# Altium PCB MINI_Calculator_Final.PcbDoc
Units mil, origin at the board's own origin, x right, y up, seen from the top; angles counter-clockwise.
Board outline 6000 x 4000 mil, 2 copper layers (Top Layer, Bottom Layer); 45 components, 51 nets, 391 pads, 0 vias.
Unrouted connection lines stored in the file: 39.
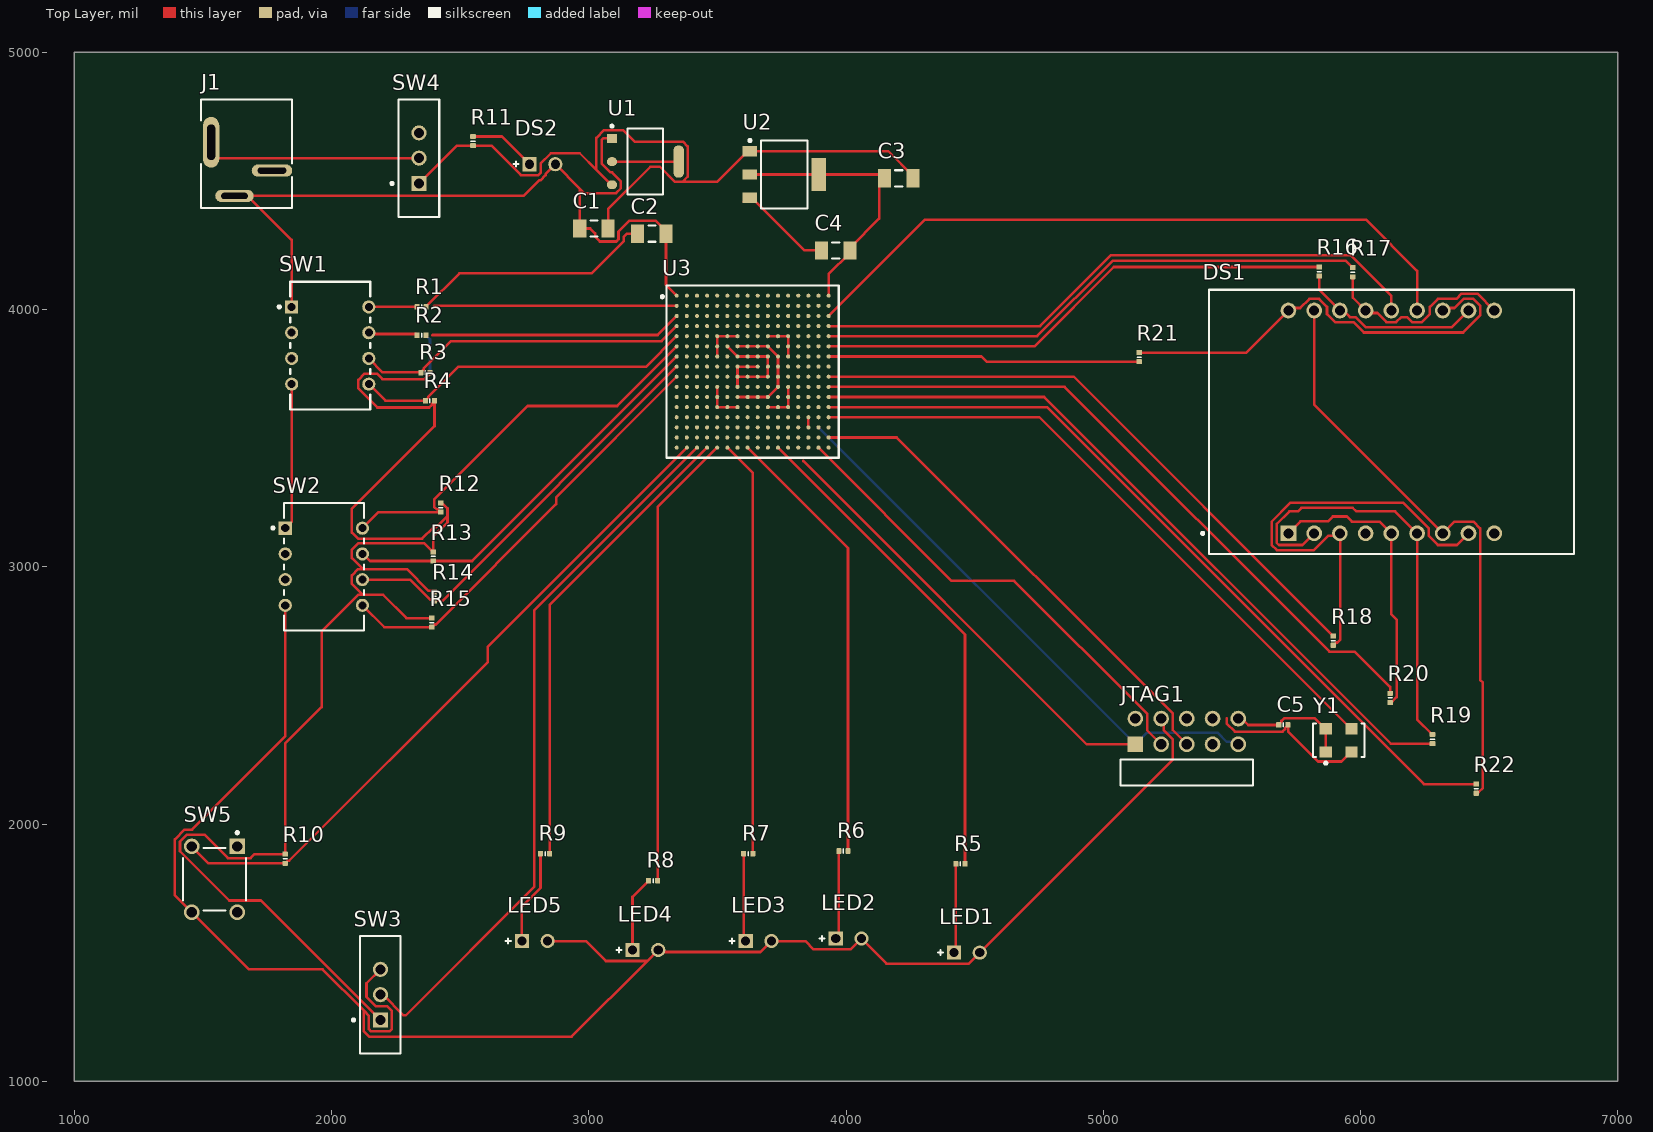
[diagram p0: Top Layer view]
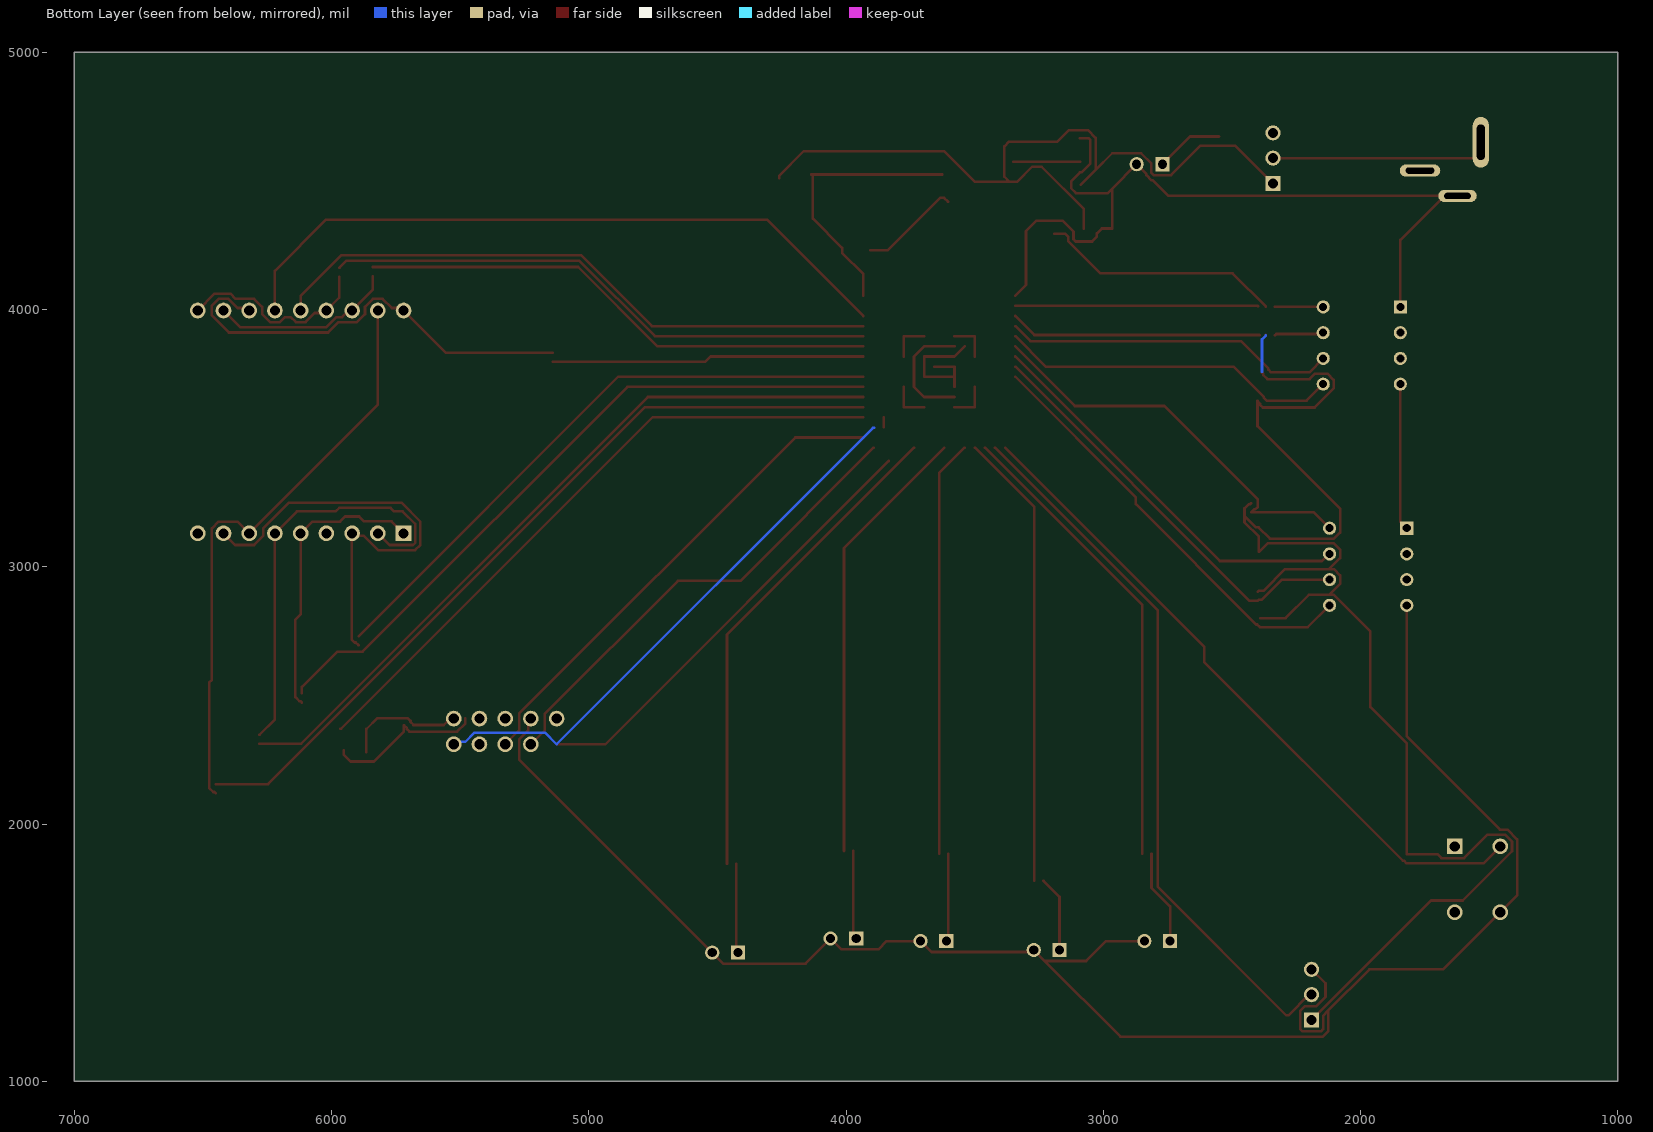
[diagram p1: Bottom Layer view, seen from below]
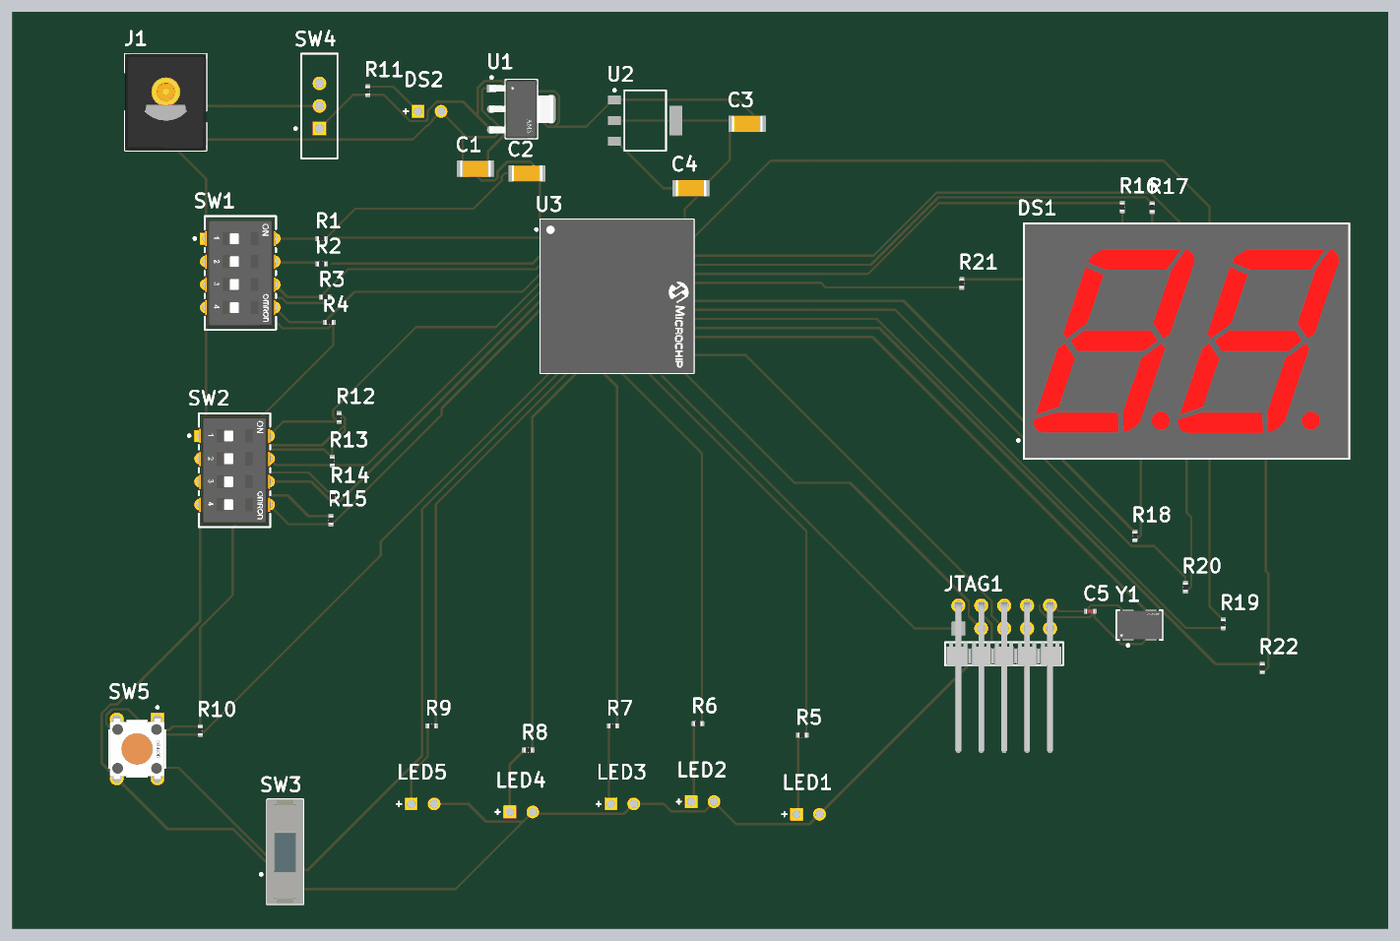
[diagram p2: 3D render of the assembled board from above, using the file's embedded part models]

## Layer stack, top to bottom
Top Solder: solder mask 0.4, Solder Resist, Dk 3.5
Top Layer: signal copper 1.4
Dielectric 1: dielectric 12.6, FR-4, Dk 4.8
Bottom Layer: signal copper 1.4
Bottom Solder: solder mask 0.4, Solder Resist, Dk 3.5

## Board outline
1000,1000 7000,1000 7000,5000 1000,5000

## Design rules (kind name [scope] priority, off if disabled: settings)
Clearance [All] p1: gap=10 ignorepadtopadclearanceinfootprint=FALSE
PolygonConnect [All] p1: connectstyle=Relief reliefconductorwidth=10 reliefentries=4 polygonreliefangle="90 Angle" airgapwidth=10
RoutingVias [All] p1: holewidth=28 width=50 viastyle="Through Hole" minholewidth=28 minwidth=50 maxholewidth=28 maxwidth=50
SolderMaskExpansion [All] p1: expansion=0 istentingtop=FALSE
SupplyNets "Schematic Supply Nets_3" [InNet('+5V')] p1: voltage=0.000
SupplyNets "Schematic Supply Nets_4" [InNet('VCC')] p2: voltage=0.000
SupplyNets "Schematic Supply Nets_2" [InNet('+1.5V')] p3: voltage=0.000
SupplyNets "Schematic Supply Nets_1" [InNet('GND')] p4: voltage=0.000
SupplyNets "Schematic Supply Nets" [InNet('+3.3V')] p5: voltage=0.000
Width [All] p1: maxlimit=10 minlimit=10 preferedwidth=10
30 further rules are at their usual default settings.

## Classes and differential pairs
component class User_IO: DS1 LED1 LED2 LED3 LED4 LED5 R1 R2 R3 R4 R5 R6 R7 R8 R9 R12 R13 R14 R15 R16 R17 R18 R19 R20 R21 R22 SW1 SW2 SW3
component class Power: C1 C2 C3 C4 DS2 J1 R11 SW4 U1 U2
component class JTAG_Clock: C5 JTAG1 R10 SW5 Y1
component class FPGA_Core: U3

## Components (designator, comment, footprint, x,y, rotation, side; value= is the part's Value field where it differs from the comment)
C1 "Capacitor 10 uF +/- 10% 16 V 1206" CAPC3216X180X50NL20T25 3020,4315 r0 top value=10µF
C2 "Capacitor 10 uF +/- 10% 16 V 1206" CAPC3216X180X50NL20T25 3245.12,4295 r0 top value=10µF
C3 "Capacitor 10 uF +/- 10% 16 V 1206" CAPC3216X180X50NL20T25 4204.88,4510 r0 top value=10µF
C4 "Capacitor 10 uF +/- 10% 16 V 1206" CAPC3216X180X50NL20T25 3960,4230 r0 top value=10µF
C5 "Capacitor 10nF +/-20% 50V 0402" CAPC0402(1005)60_L 5700,2385 r0 top value=10nF
DS1 "DC08-11SRWA" FP-DC08-11SRWA-MFG 6120,3563.07 r0 top
DS2 "LTL-1CHG" LTST-LTL-1CHG-2 2820,4565 r0 top
J1 "694106402002" 694106402002 1670,4605 r0 top
JTAG1 "MTSW-105-09-F-D-383-RA" SMTC-MTSW-105-09-X-D-383-RA 5125,2310 r0 top
LED1 "LTL-1CHG" LTST-LTL-1CHG-2 4470,1500 r0 top
LED2 "LTL-1CHG" LTST-LTL-1CHG-2 4010,1555 r0 top
LED3 "LTL-1CHG" LTST-LTL-1CHG-2 3660,1545 r0 top
LED4 "LTL-1CHG" LTST-LTL-1CHG-2 3220,1510 r0 top
LED5 "LTL-1CHG" LTST-LTL-1CHG-2 2790,1545 r0 top
R1 "Resistor 10K  +/-1 % 0402 63 mW" RESC0402(1005)_L 2350,4010 r0 top value=10k
R2 "Resistor 10K  +/-1 % 0402 63 mW" RESC0402(1005)_L 2350,3900 r0 top value=10k
R3 "Resistor 10K  +/-1 % 0402 63 mW" RESC0402(1005)_L 2365,3755 r0 top value=10k
R4 "Resistor 10K  +/-1 % 0402 63 mW" RESC0402(1005)_L 2382.72,3645 r0 top value=10k
R5 "330R2J" RESC0402(1005)_L 4445,1845 r0 top value=330
R6 "330R2J" RESC0402(1005)_L 3990,1895 r0 top value=330
R7 "330R2J" RESC0402(1005)_L 3620,1885 r0 top value=330
R8 "330R2J" RESC0402(1005)_L 3250,1780 r0 top value=330
R9 "330R2J" RESC0402(1005)_L 2830,1885 r0 top value=330
R10 "10KR2F" RESC0402(1005)_L 1820,1865 r90 top value=10k
R11 "Resistor 330R +/-5 % 0402 63 mW" RESC0402(1005)_L 2550,4655 r90 top value=330
R12 "Resistor 10K  +/-1 % 0402 63 mW" RESC0402(1005)_L 2425,3230 r90 top value=10k
R13 "Resistor 10K  +/-1 % 0402 63 mW" RESC0402(1005)_L 2395,3040 r90 top value=10k
R14 "Resistor 10K  +/-1 % 0402 63 mW" RESC0402(1005)_L 2400,2885 r90 top value=10k
R15 "Resistor 10K  +/-1 % 0402 63 mW" RESC0402(1005)_L 2390,2782.72 r90 top value=10k
R16 "330R2J" RESC0402(1005)_L 5840,4147.72 r90 top value=330
R17 "330R2J" RESC0402(1005)_L 5970,4145 r90 top value=330
R18 "330R2J" RESC0402(1005)_L 5895,2712.72 r90 top value=330
R19 "330R2J" RESC0402(1005)_L 6280,2330 r90 top value=330
R20 "330R2J" RESC0402(1005)_L 6115,2490 r90 top value=330
R21 "330R2J" RESC0402(1005)_L 5140,3815 r90 top value=330
R22 "330R2J" RESC0402(1005)_L 6450,2137.28 r90 top value=330
SW1 "A6TN-4104" FP-A6TN-4104-MFG 1995,3860 r270 top
SW2 "A6TN-4104" FP-A6TN-4104-MFG 1970,3000 r270 top
SW3 "EG1218" ESWI-EG1218_V 2190,1336.57 r90 top
SW4 "EG1218" ESWI-EG1218_V 2340,4588.43 r90 top
SW5 "B3F-1055" FP-B3F-1055-MFG 1545,1785 r270 top
U1 "AMS1117-3.3" FP-AMS1117-IPC_C 3220,4575 r0 top
U2 "LT1963AEST-1.5#TRPBF" LT-ST-3-SOT-223_N 3760,4525 r0 top
U3 "A3P600-FGG256I" FP-FG256-IPC_C 3637.2,3758.43 r0 top
Y1 "ASFLM1-50.000MHZ-C" FP-ASFLM-MFG 5915,2325 r0 top

## Footprints (in the part's own frame and the unit in brackets; to place one, negate y for a bottom-side part, rotate by r counter-clockwise, add the part's x,y. Pads: shape width x height; smd on the part's side, far side on the other; paste and mask are expansions set on the pad)
694106402002 [mm] "DC Power Jack Vertical THT ?6.4"
  oval 1.6x5 hole 0.8 slot 3.5 at 90 deg: 1(-3.5,1.15)
  oval 3.8x1.2 hole 0.6 slot 2.6 at 0 deg: 2(-1.2,-4.15)
  oval 4x1.2 hole 0.6 slot 2.8 at 0 deg: 3(2.5,-1.65)
  silkscreen extent -4.5,-5.35 4.5,5.35, body extent -4.5,-5.35 4.5,5.35, height 14.1
CAPC0402(1005)60_L [mm] "Chip Capacitor, Body 1.0x0.5mm, Height 0.6mm, IPC High Density"
  rrect25% 0.5x0.55 smd: 1(-0.45,0) 2(0.45,0)
  silkscreen extent 0,-0.2 0,0.2, body extent -0.5,-0.25 0.5,0.25, height 0.6
CAPC3216X180X50NL20T25 [mm] "Chip Capacitor, 2-Leads, Body 3.40x1.80mm, IPC Medium Density"
  rect 1.3x1.8 smd: 1(-1.4,0) 2(1.4,0)
  silkscreen extent -0.35,-0.8 0.35,0.8, body extent -1.7,-0.9 1.7,0.9, height 1.8
ESWI-EG1218_V [mm] "THD, 3-Leads, Body 11.6x4mm, Pitch 2.5mm"
  rect 1.5x1.5 hole 1: 1(-2.5,0)
  round 1.5 hole 1: 2(0,0) 3(2.5,0)
  silkscreen extent -5.8,-2 5.8,2.77, body extent -5.8,-2 5.8,2, height 7.4
FP-A6TN-4104-MFG [mm]
  rect 1.3x1.3 hole 0.8 paste-2539.97 mask+0: 1(-3.81,-3.81)
  round 1.3 hole 0.8 paste-2539.97 mask+0: 2(-1.27,-3.81) 3(1.27,-3.81) 4(3.81,-3.81) 5(3.81,3.81) 6(1.27,3.81) 7(-1.27,3.81) 8(-3.81,3.81)
  silkscreen extent -6.3,-5.16 6.3,3.95, body extent -6.4,-4.56 6.4,4.56, height 0.25
FP-AMS1117-IPC_C [mm]
  rect 1.004x0.872 smd paste+0 mask+0: 1(-3.295,2.29)
  rrect100% 1.004x0.872 smd paste+0 mask+0: 2(-3.295,0) 3(-3.295,-2.29)
  rrect87% 1.004x3.182 smd paste+0 mask+0: 4(3.295,0)
  silkscreen extent -3.42,-3.25 1.75,3.62, body extent -3.9,-3.35 3.9,3.35, height 0.25
FP-ASFLM-MFG [mm]
  rect 1.2x1.1 smd paste+0 mask+0: 1(-1.27,-1.15) 2(1.27,-1.15) 3(1.27,1.15) 4(-1.27,1.15)
  silkscreen extent -2.55,-2.37 2.55,1.65, body extent -2.65,-1.8 2.65,1.8, height 0.25
FP-B3F-1055-MFG [mm]
  rect 1.55x1.55 hole 1 paste-2539.97 mask+0: 1(-3.25,2.25)
  round 1.55 hole 1 paste-2539.97 mask+0: 2(3.25,2.25) 3(-3.25,-2.25) 4(3.25,-2.25)
  silkscreen extent -4.72,-3.1 3.1,3.1, body extent -4.13,-3.2 4.13,3.2, height 0.25
FP-DC08-11SRWA-MFG [mm]
  rect 1.55x1.55 hole 1 paste-2539.97 mask+0: 1(-10.16,-11)
  round 1.55 hole 1 paste-2539.97 mask+0: 2(-7.62,-11) 3(-5.08,-11) 4(-2.54,-11) 5(0,-11) 6(2.54,-11) 7(5.08,-11) 8(7.62,-11) 9(10.16,-11) 10(10.16,11) 11(7.62,11) 12(5.08,11) 13(2.54,11) 14(0,11) 15(-2.54,11) 16(-5.08,11) 17(-7.62,11) 18(-10.16,11)
  silkscreen extent -18.75,-13.05 18.03,13.05, body extent -18.13,-13.15 18.13,13.15, height 0.25
FP-FG256-IPC_C [mm]
  round 0.4 smd paste+0 mask+0: A1(-7.5,7.5) A2(-6.5,7.5) A3(-5.5,7.5) A4(-4.5,7.5) A5(-3.5,7.5) A6(-2.5,7.5) A7(-1.5,7.5) A8(-0.5,7.5) A9(0.5,7.5) A10(1.5,7.5) A11(2.5,7.5) A12(3.5,7.5) A13(4.5,7.5) A14(5.5,7.5) A15(6.5,7.5) A16(7.5,7.5) B1(-7.5,6.5) B2(-6.5,6.5) B3(-5.5,6.5) B4(-4.5,6.5) B5(-3.5,6.5) B6(-2.5,6.5) B7(-1.5,6.5) B8(-0.5,6.5) B9(0.5,6.5) B10(1.5,6.5) B11(2.5,6.5) B12(3.5,6.5) B13(4.5,6.5) B14(5.5,6.5) B15(6.5,6.5) B16(7.5,6.5) C1(-7.5,5.5) C2(-6.5,5.5) C3(-5.5,5.5) C4(-4.5,5.5) C5(-3.5,5.5) C6(-2.5,5.5) C7(-1.5,5.5) C8(-0.5,5.5) C9(0.5,5.5) C10(1.5,5.5) C11(2.5,5.5) C12(3.5,5.5) C13(4.5,5.5) C14(5.5,5.5) C15(6.5,5.5) C16(7.5,5.5) D1(-7.5,4.5) D2(-6.5,4.5) D3(-5.5,4.5) D4(-4.5,4.5) D5(-3.5,4.5) D6(-2.5,4.5) D7(-1.5,4.5) D8(-0.5,4.5) D9(0.5,4.5) D10(1.5,4.5) D11(2.5,4.5) D12(3.5,4.5) D13(4.5,4.5) D14(5.5,4.5) D15(6.5,4.5) D16(7.5,4.5) E1(-7.5,3.5) E2(-6.5,3.5) E3(-5.5,3.5) E4(-4.5,3.5) E5(-3.5,3.5) E6(-2.5,3.5) E7(-1.5,3.5) E8(-0.5,3.5) E9(0.5,3.5) E10(1.5,3.5) E11(2.5,3.5) E12(3.5,3.5) E13(4.5,3.5) E14(5.5,3.5) E15(6.5,3.5) E16(7.5,3.5) F1(-7.5,2.5) F2(-6.5,2.5) F3(-5.5,2.5) F4(-4.5,2.5) F5(-3.5,2.5) F6(-2.5,2.5) F7(-1.5,2.5) F8(-0.5,2.5) F9(0.5,2.5) F10(1.5,2.5) F11(2.5,2.5) F12(3.5,2.5) F13(4.5,2.5) F14(5.5,2.5) F15(6.5,2.5) F16(7.5,2.5) G1(-7.5,1.5) G2(-6.5,1.5) G3(-5.5,1.5) G4(-4.5,1.5) G5(-3.5,1.5) G6(-2.5,1.5) G7(-1.5,1.5) G8(-0.5,1.5) G9(0.5,1.5) G10(1.5,1.5) G11(2.5,1.5) G12(3.5,1.5) G13(4.5,1.5) G14(5.5,1.5) G15(6.5,1.5) G16(7.5,1.5) H1(-7.5,0.5) H2(-6.5,0.5) H3(-5.5,0.5) H4(-4.5,0.5) H5(-3.5,0.5) H6(-2.5,0.5) H7(-1.5,0.5) H8(-0.5,0.5) H9(0.5,0.5) H10(1.5,0.5) H11(2.5,0.5) H12(3.5,0.5) H13(4.5,0.5) H14(5.5,0.5) H15(6.5,0.5) H16(7.5,0.5) J1(-7.5,-0.5) J2(-6.5,-0.5) J3(-5.5,-0.5) J4(-4.5,-0.5) J5(-3.5,-0.5) J6(-2.5,-0.5) J7(-1.5,-0.5) J8(-0.5,-0.5) J9(0.5,-0.5) J10(1.5,-0.5) J11(2.5,-0.5) J12(3.5,-0.5) J13(4.5,-0.5) J14(5.5,-0.5) J15(6.5,-0.5) J16(7.5,-0.5) K1(-7.5,-1.5) K2(-6.5,-1.5) K3(-5.5,-1.5) K4(-4.5,-1.5) K5(-3.5,-1.5) K6(-2.5,-1.5) K7(-1.5,-1.5) K8(-0.5,-1.5) K9(0.5,-1.5) K10(1.5,-1.5) K11(2.5,-1.5) K12(3.5,-1.5) K13(4.5,-1.5) K14(5.5,-1.5) K15(6.5,-1.5) K16(7.5,-1.5) L1(-7.5,-2.5) L2(-6.5,-2.5) L3(-5.5,-2.5) L4(-4.5,-2.5) L5(-3.5,-2.5) L6(-2.5,-2.5) L7(-1.5,-2.5) L8(-0.5,-2.5) L9(0.5,-2.5) L10(1.5,-2.5) L11(2.5,-2.5) L12(3.5,-2.5) L13(4.5,-2.5) L14(5.5,-2.5) L15(6.5,-2.5) L16(7.5,-2.5) M1(-7.5,-3.5) M2(-6.5,-3.5) M3(-5.5,-3.5) M4(-4.5,-3.5) M5(-3.5,-3.5) M6(-2.5,-3.5) M7(-1.5,-3.5) M8(-0.5,-3.5) M9(0.5,-3.5) M10(1.5,-3.5) M11(2.5,-3.5) M12(3.5,-3.5) M13(4.5,-3.5) M14(5.5,-3.5) M15(6.5,-3.5) M16(7.5,-3.5) N1(-7.5,-4.5) N2(-6.5,-4.5) N3(-5.5,-4.5) N4(-4.5,-4.5) N5(-3.5,-4.5) N6(-2.5,-4.5) N7(-1.5,-4.5) N8(-0.5,-4.5) N9(0.5,-4.5) N10(1.5,-4.5) N11(2.5,-4.5) N12(3.5,-4.5) N13(4.5,-4.5) N14(5.5,-4.5) N15(6.5,-4.5) N16(7.5,-4.5) P1(-7.5,-5.5) P2(-6.5,-5.5) P3(-5.5,-5.5) P4(-4.5,-5.5) P5(-3.5,-5.5) P6(-2.5,-5.5) P7(-1.5,-5.5) P8(-0.5,-5.5) P9(0.5,-5.5) P10(1.5,-5.5) P11(2.5,-5.5) P12(3.5,-5.5) P13(4.5,-5.5) P14(5.5,-5.5) P15(6.5,-5.5) P16(7.5,-5.5) R1(-7.5,-6.5) R2(-6.5,-6.5) R3(-5.5,-6.5) R4(-4.5,-6.5) R5(-3.5,-6.5) R6(-2.5,-6.5) R7(-1.5,-6.5) R8(-0.5,-6.5) R9(0.5,-6.5) R10(1.5,-6.5) R11(2.5,-6.5) R12(3.5,-6.5) R13(4.5,-6.5) R14(5.5,-6.5) R15(6.5,-6.5) R16(7.5,-6.5) T1(-7.5,-7.5) T2(-6.5,-7.5) T3(-5.5,-7.5) T4(-4.5,-7.5) T5(-3.5,-7.5) T6(-2.5,-7.5) T7(-1.5,-7.5) T8(-0.5,-7.5) T9(0.5,-7.5) T10(1.5,-7.5) T11(2.5,-7.5) T12(3.5,-7.5) T13(4.5,-7.5) T14(5.5,-7.5) T15(6.5,-7.5) T16(7.5,-7.5)
  silkscreen extent -9.05,-8.5 8.5,8.5, body extent -8.6,-8.6 8.6,8.6, height 0.25
LT-ST-3-SOT-223_N [mm] "SOT223, 4-Leads, Body 6.505x3.505mm, Pitch 2.3mm, IPC Medium Density"
  rect 1.4x1 smd: 1(-3.4,2.3) 2(-3.4,0) 3(-3.4,-2.3)
  rect 1.4x3.25 smd: 4(3.4,0)
  silkscreen extent -3.52,-3.35 2.3,3.47, body extent -1.86,-3.35 1.86,3.35, height 1.8
LTST-LTL-1CHG-2 [mm] "TH, 2-Leads, Dia 3.8mm"
  rect 1.4x1.4 hole 0.9: 1(-1.27,0)
  round 1.4 hole 0.9: 2(1.27,0)
  silkscreen extent -2.87,-0.25 -2.37,0.25, body extent -1.9,-1.9 1.9,1.9, height 6.5
RESC0402(1005)_L [mm] "Chip Resistor, Body 1.0x0.5mm, IPC High Density"
  rrect25% 0.5x0.55 smd: 1(-0.45,0) 2(0.45,0)
  silkscreen extent 0,-0.2 0,0.2, body extent -0.5,-0.25 0.5,0.25, height 0.3
SMTC-MTSW-105-09-X-D-383-RA [mm] "Assembly .025\" [.64] SQ Post Terminal Strip, 2x5 Pins, Right Angle, 2.54mm Pitch, Male"
  rect 1.55x1.55 smd: 1(0,0)
  round 1.55 hole 1.02: 2(0,2.54) 3(2.54,0) 4(2.54,2.54) 5(5.08,0) 6(5.08,2.54) 7(7.62,0) 8(7.62,2.54) 9(10.16,0) 10(10.16,2.54)
  silkscreen extent -1.46,-4.06 11.62,-1.52, body extent -1.27,-13.79 11.43,2.86, height 5.59

## Part data
C1 C2 C3 C4: library part CMP-001-00016-6, "Chip Capacitor, 10 uF, +/- 10%, 16 V, 1206 (3216 Metric)", Capacitor Type=Ceramic, Case/Package=1206, Max Operating Temperature=125°C, Min Operating Temperature=-55°C, Tolerance=10%, Voltage Rating=16V, Mounting Technology=SM, Pins=2, RoHS Compliant=True
C5: library part CMP-001-00069-3, "Chip Capacitor, 10nF +/-20%, 50V, 0402, Thickness 0.6 mm", Case/Package=0402, Max Operating Temperature=85°C, Min Operating Temperature=-55°C, Tolerance=5%, Voltage Rating=50V, Mounting Technology=SMT, Pins=2
DS1: library part CMP-00030-00004-1, "7 Seg Numeric LED Display, 2-Character, Super Bright Red, 20.32mm", Case/Package=DIP, Max Operating Temperature=85°C, Min Operating Temperature=-40°C
DS2 LED1 LED2 LED3 LED4 LED5: library part CMP-007-00019-2, "LED Uni-Color Green, 100 mW, 30 mA, -55 to 100 degC, 2-Pin THD, RoHS, Bulk", Case/Package=Radial, Colour=Green, Forward Current=30mA, Forward Voltage=2.6V, Manufacturer=Lite-On, Max Operating Temperature=100°C, Min Operating Temperature=-55°C, Package Description="2-Pin Through Hole Device, Dia 3.8 mm", Package Quantity=1000, Power=100mW, Datasheet URL=http://datasheet.octopart.com/LTL-1CHG-Lite-On-datasheet-143841.pdf, Datasheet Version=Mar-00, Illumination Colour=Green, Lens Style=Dome, Luminous Intensity=12.6mcd, Manufacturer URL=http://www.us.liteon.com/, Mounting Technology=TH, Nominal Vf=2.1V, Package Reference=LTL-1CHG, Packaging=Bulk, Pins=2, RoHS Compliant=True, Viewing Angle=60degrees
J1: library part CMP-1502-00189-3, "DC Power Jack Connector WR-DC, Male, Vertical, THT, 3 A, 20 V", Color=Black, Current Rating=3A, Flammability Rating="UL94 V-0", Insulation Resistance=100MΩ, Max Operating Temperature=85°C, Min Operating Temperature=-40°C, Operating Supply Voltage=20V, Voltage Rating=30V, Connector Type=Power, Contact Gender=Female, Contact Material=Gold, Contact Plating=Tin, Gender=Male, Height=14.3mm, Housing Material=Polyamide, Mount="Through Hole", Number of Contacts=1, Orientation=Vertical, Packaging=Bulk, REACH SVHC=Unknown, RoHS=Compliant, Shielding=Unshielded, Termination="Through Hole", Voltage Rating (DC)=20V
JTAG1: library part CMP-002-00071-1, "Pin Header, Board-to-Board, 2 Rows, 10 Contacts, Through Hole, MTSW Series, Unshrouded, Horizontal", Max Operating Temperature=125°C, Min Operating Temperature=-55°C, Pins=10
R1 R2 R3 R4 R12 R13 R14 R15: library part CMP-009-00149-3, "Chip Resistor, 10 kOhms, +/-1 %, 63 mW, -55 to 125 degC, 0402", Case/Package=0402, Max Operating Temperature=155°C, Min Operating Temperature=-55°C, Power=63mW, Tolerance=1%, Pins=2
R5 R6 R7 R8 R9 R16 R17 R18 R19 R20 R21 R22: library part CMP-009-00095-2, "330R 0.063W 5% 0402 (1005 Metric)  SMD", Case/Package=0402, Power=63mW, Tolerance=5%, Mounting Technology=SMT, Pins=2
R10: library part CMP-009-00066-2, "10K 0.063W 1% 0402 (1005 Metric)  SMD", Case/Package=0402, Power=63mW, Tolerance=1%, Mounting Technology=SMT, Pins=2
R11: library part CMP-009-00132-3, "Chip Resistor, 330 Ohms, +/-5 %, 63 mW, -55 to 155 degC, 0402", Case/Package=0402, Max Operating Temperature=155°C, Min Operating Temperature=-55°C, Power=63mW, Tolerance=5%, Pins=2
SW1 SW2: library part CMP-08827-000057-1, "SWITCH SLIDE DIP SPST 25MA 24V", Contact Resistance=200mR, Current Rating=25mA, Max Operating Temperature=85°C, Max Voltage Rating (DC)=24V, Min Operating Temperature=-30°C, Package Quantity=35, Actuator Length=1mm, Actuator Type="Slide (Standard)", Electrical Life=1000Cycles, Length=0.476inch, Max Current Rating=25mA, Mount="Through Hole", Number of Circuits=4, Number of Positions=4, Orientation=Straight, Packaging=Rail/Tube, Pitch=0.1inch, RoHS Compliant=Yes, Series=A6TN, Terminal Pitch=2.54mm, Termination="PC Pins", Throw Configuration=SPST, Voltage Rating (DC)=24V, Washable=Yes, Weight=0.58g
SW3: library part CMP-011-00006-2, "Slide Switch, SPDT, 500 V, -20 to 70 degC, 3-Pin THD, RoHS, Bulk", Contact Current Rating=200mA, Manufacturer=E-Switch, Max Operating Temperature=70°C, Min Operating Temperature=-20°C, Operating Force=250gf, Package Description="3-Pin Through Hole Device, Body 11.6 x 4 mm, Pitch 2.5 mm", Package Quantity=1000, Voltage Rating (AC)=30V, Case/Package=EG1218, Contact Finish=Silver, Contact Material=Copper, Contact Plating=Silver, Current Rating=200mA, Datasheet URL=https://www.e-switch.com/system/asset/product_line/data_sheet/119/EG.pdf, Datasheet Version=Oct-15, Manufacturer URL=http://www.e-switch.ch/en/, Mounting Technology=TH, Package Reference=EG1218, Packaging=Bulk, Pins=3, RoHS Compliant=True, Throw Configuration=SPDT, Voltage Rating (DC)=30V
SW4: library part CMP-1696-00002-1, "Slide Switch, 500 V, -20 to 70 degC, 3-Pin THD, RoHS", Case\Package=SOT-23-5, Dropout Voltage="300 mV", Max Input Voltage="8 V", Max Operating Temperature="85 degC", Max Ouput Current="150 mA", Max Power Dissipation="250 mW", Min Input Voltage="4.3 V", Min Operating Temperature="-40 degC", Nominal Output Voltage="3.3 V", Package Quantity=3000, ComponentLink1Description="Manufacturer URL", ComponentLink1URL=http://www.e-switch.ch/en/, ComponentLink2Description=Datasheet, ComponentLink2URL=https://www.e-switch.com/system/asset/product_line/data_sheet/119/EG.pdf, DatasheetVersion=Oct-15, Height="1.3 mm", Length="3 mm", Mount="Surface Mount", Output Current="150 mA", Output Voltage="3.3 V", Outputs=1, PackageDescription="3-Pin Through Hole Device, Body 11.6 x 4 mm, Pitch 2.5 mm", PackageReference=EG1218, Packaging="Tape and Reel", Pins=5, Power Rating="250 mW", Radiation Hardening=No, REACH SVHC="No SVHC", RoHSCompliant=true, Width="1.8 mm"
SW5: library part CMP-08834-000061-1, "SWITCH TACTILE SPST-NO 0.05A 24V", Actuator Color=Orange, Contact Current Rating=50mA, Contact Resistance=100mR, Max Operating Temperature=70°C, Max Voltage Rating (DC)=24V, Min Operating Temperature=-25°C, Operating Force=2.55N, Package Quantity=1500, Actuator Length=3mm, Contact Material=Gold, Contact Plating=Silver, Contact Type="1 maker", Current Rating=50mA, Depth=6mm, Electrical Life=300000Cycles, Height=7.3mm, Illumination Type=Non-Illuminated, Lead Free="Lead Free", Length=6mm, Max Current Rating=50mA, Mechanical Life=100000Cycles, Mount="Through Hole", Number of Poles=1, Orientation=Straight, Packaging=Bag, RoHS Compliant=Yes, Series=B3F, Switch Function=Off-Mom, Switch Travel=0.25mm, Termination="PC Pins", Throw Configuration=SPST, Voltage Rating (DC)=24V, Weight=0.25g, Width=6mm
U1: library part CMP-209535-000001-1, "LDO Voltage Regulators 1A, 3.3V", Dropout Voltage=1.1V, Manufacturer="Advanced Monolithic Systems", Max Junction Temp=+125°C, Max Power Dissipation=1.2W, Max Supply Voltage=15V, Nominal Supply Current=5mA, Output Current=1A, Output Voltage=3.3V, Package=AMS1117, Temperature="-40°C to +125°C", Temperature Range Low=-40°C, Automotive=No, Category=IC, ComponentLink2Description=Datasheet, ComponentLink2URL=http://www.advanced-monolithic.com/pdf/ds1117.pdf, Device Class L1="Integrated Circuits (ICs)", Device Class L2="Power Management ICs", Device Class L3="Voltage Regulators - Linear", Height=1.8mm, Ipc Land Pattern Name=SOT229P700X180-4, Lead Free=Yes, Manufacturer Part Number=AMS1117-3.3, Number Of Outputs=1, Octopart=https://octopart.com/ams1117-3.3-advanced+monolithic+systems-25899300, Output Type=Fixed, RoHS=TRUE, Standoff Height=0.64mm, Temperature Range High=+125°C
U2: library part CMP-0476-01777-1, "1.5 A, Low Noise, Fast Transient Response LDO Regulator, 2.1 to 20 V Vin, 1.5 V Vout, 3-pin SOT223 (ST-3), -40 to 125 degC, Pb-Free, Tape and Reel", Dropout Voltage(V)=0.34, Manufacturer="Linear Technology", Output Voltage="1.5 V", Shutdown Current(uA)=0.01, ComponentLink1Description="Manufacturer URL", ComponentLink1URL=http://www.linear.com/, ComponentLink2Description=Datasheet, ComponentLink2URL=http://cds.linear.com/docs/en/datasheet/1963afe.pdf, ComponentLink3Description="Package Specification", ComponentLink3URL=http://cds.linear.com/docs/en/packaging/SOT_3_05-08-1630.pdf, DatasheetVersion="Rev. E", Discrete Pass Element=no, Iout(mA)=1500, Isupply(mA)=1, Mounting Technology="Surface Mount", Noise(uV)=40, Number Of Outputs=1, PackageDescription="3-Pin Plastic SOT-223, 3.505 x 6.505 mm Body, Pitch 2.3 mm", PackageReference=ST-3, PackageVersion=Jun-10, Packing="Tape and Reel", PartNumber=LT1963AEST-1.5#TRPBF, PSRR(dB)=63, RoHS=TRUE, Vin Max(V)=20, Vin Min(V)=2.1
U3: library part CMP-031-00006-1, "FPGA ProASIC®3 Family 600K Gates 231MHz 130nm (CMOS) Technology 1.5V 256-Pin FBGA", Max Operating Temperature=100°C, Max Supply Voltage=3.6V, Min Operating Temperature=-40°C, Min Supply Voltage=1.4V, Mounting Technology="Surface Mount", Pins=256
Y1: library part CMP-27762-000850-1, "MEMS Oscillator 50MHz ±50ppm LVCMOS 3.0V 4-SMD 5mm x 3.2mm", Case/Package=QFN, Frequency=50MHz, Frequency Stability=50ppm, Load Capacitance=15pF, Packaging=Rail/Tube, Radiation Hardening=No, RoHS Compliant=Yes

## Nets (pads, with @x,y where several pads share a name; then routed paths per layer and width w, separated by ;. In a path a pad name is that pad's centre, name@x,y a point inside that pad or via, vN(x,y) a via of type N, cw(c..) or ccw(c..) an arc to the next point about the centre after c; other vN are vias at no path point)
+1.5V: C4.1 U2.3 U3.J3 | length 392.1
  Top Layer w10: U2.3@3603.58,4419.76 3618.27,4434.45 3634.02,4434.45 3838.46,4230 C4.1
+3.3V: C2.1 R1.2 R2.2 R3.2 R4.2 R10.2 R12.2 R13.2 R14.2 R15.2 SW3.1 U1.2 U1.4 U3.C3 U3.C14 U3.E5 U3.E6 U3.E7 U3.E10 U3.E11 U3.E12 U3.F5 U3.F12 U3.G5 U3.G12 U3.K5 U3.K12 U3.L5 U3.L12 U3.M5 U3.M6 U3.M7 U3.M10 U3.M11 U3.M12 U3.N14 U3.P3 U3.P12 U3.P14 | length 7896.3
  Top Layer w10: 2122.01,2890.59 2079.41,2933.19 2079.41,2966.81 2103.19,2990.59 2122.01,2990.59 ; SW3.1 1725.59,1702.56 1602.45,1702.56 1410.91,1894.1 1410.91,1931.8 1437.57,1958.46 1505.83,1958.46 1596.86,1867.44 1685.02,1867.44 1700.29,1882.72 R10.2 1820,2312.61 1961.59,2454.21 1961.59,2749 2103.19,2890.59 2201.02,2890.59 2291.18,2800.43 R15.2 ; R1.2 2367.72,4010.98 2497.18,4140.45 3011.09,4140.45 3135.71,4265.07 3135.71,4281.3 3149.41,4295 C2.1 ; R3.2 2377.87,3750.16 2377.87,3745.15 2361.9,3729.17 2197.54,3729.17 2176.13,3750.59 2128.19,3750.59 2104.41,3726.81 2104.41,3693.19 2178.42,3619.17 2379.61,3619.17 2389.84,3629.4 2389.84,3633.43 2400.43,3644.02 R4.2 2400.43,3546.69 2079.41,3225.67 2079.41,3133.19 2103.19,3109.41 2351.68,3109.41 2395.81,3153.54 2406.7,3153.54 2450.83,3197.67 ; R14.2 2395.16,2907.56 2375.85,2907.56 2292.82,2990.59 2122.01,2990.59 ; R12.2 2429.84,3242.87 2434.85,3242.87 2450.83,3226.9 2450.83,3197.67 ; U1.2 U1.4 ; U3.K5 U3.L5 U3.M5 U3.M6 U3.M7 ; U3.G5 U3.F5 U3.E5 U3.E6 U3.E7 ; U3.M10 U3.M11 U3.M12 U3.L12 U3.K12 ; U3.E10 U3.E11 U3.E12 U3.F12 U3.G12 ; U3.P14 U3.N14 ; 2122.01,2990.59 2079.41,3033.19 2079.41,3066.81 2103.19,3090.59 2361.14,3090.59 2394.02,3057.72 R13.2 2395,3116.82 2450.83,3172.64 2450.83,3197.67
  Bottom Layer w10: 2367.72,3899.02 2382.72,3884.02 2382.72,3757.72
+5V: C1.2 C3.2 R11.1 SW4.1 U1.3 U2.1 | length 3077.3
  Top Layer w10: SW4.1 2487.28,4637.28 R11.1 2621.38,4637.28 2736.22,4522.44 2803.77,4522.44 2812.56,4531.23 2812.56,4567.74 2852.37,4607.56 2964.96,4607.56 3029.65,4542.87 ; C1.2 3075.12,4390.98 3239.14,4555 3276.18,4555 3333.82,4497.36 3365.63,4497.36 ; U1.3@3087.67,4484.84 3029.65,4542.87 ; C3.2 4260,4519.84 4164.29,4615.55 3618.27,4615.55 3500.08,4497.36 3365.63,4497.36 ; 3029.65,4542.87 3029.65,4667.58 3059.39,4697.33 3116.26,4697.33 3133.85,4697.33 3178.54,4652.64 3365.63,4652.64 3384.49,4633.78 3384.49,4516.22 3365.63,4497.36
A0: R1.1 SW1.8 U3.B1 | length 1132
  Top Layer w10: SW1.8 R1.1 ; 2398.12,4012.12 2400.33,4014.33 U3.B1
A1: R2.1 SW1.7 U3.C1 | length 1172.9
  Top Layer w10: SW1.7 2150,3905 2327.44,3905 2332.28,3900.16 R2.1 ; 2367.72,3900 2367.72,3900.98 ; 2392.56,3900 2393.54,3900.98 3267.95,3900.98 U3.C1
A2: R3.1 SW1.6 U3.D1 | length 1296.1
  Top Layer w10: SW1.6 2199.02,3755.98 2347.28,3755.98 2357.87,3766.57 2357.87,3770.6 2464.13,3876.85 3283.19,3876.85 U3.D1
A3: R4.1 SW1.5 U3.E1 | length 1329.5
  Top Layer w10: SW1.5 2209.02,3645.98 2365,3645.98 2375.59,3656.57 2375.59,3660.6 2492.85,3777.86 3223.57,3777.86 U3.E1
ADD_SUB: SW3.2 U3.T3 | length 2807.4
  Top Layer w10: SW3.2 2200.13,1336.57 2280.27,1256.43 2288.55,1256.43 2787.44,1755.32 2787.44,2829.92 U3.T3
B0: R12.1 SW2.8 U3.F1 | length 1582.5
  Top Layer w10: SW2.8 2182.28,3212.28 R12.1@2424.02,3212.28 ; R12.1 R12.1@2424.02,3212.28 ; U3.F1 3110.08,3625 2761.84,3625 2399.17,3262.33 2399.17,3233.1 2409.4,3222.87 2413.43,3222.87 R12.1@2424.02,3212.28
B1: R13.1 SW2.7 U3.G1 | length 1562.8
  Top Layer w10: SW2.7 2121.97,3050 2149.69,3022.28 R13.1 2546.73,3022.28 U3.G1
B2: R14.1 SW2.6 U3.H1 | length 1633.5
  Top Layer w10: SW2.6 2305.13,2950 2383,2872.13 2395.16,2872.13 R14.1 2431.1,2867.28 U3.H1
B3: R15.1 SW2.5 U3.J1 | length 1676.2
  Top Layer w10: SW2.5 2205,2765 R15.1 2390.98,2765 2401.57,2775.59 2405.6,2775.59 2873.21,3243.21 2873.21,3270.03 U3.J1
CARRY: R9.2 U3.T4 | length 1831.8
  Top Layer w10: R9.2 2847.72,2850.83 U3.T4
CLK_50MHZ: U3.N16 Y1.3 | length 2534.1
  Top Layer w10: U3.N16 4752.05,3581.26 5963.03,2370.28 Y1.3
DIGIT1: DS1.14 U3.D16 | length 2423.4
  Top Layer w10: U3.D16 4754.41,3935.59 5029.09,4210.28 5962.88,4210.28 6120,4053.16 DS1.14
DIGIT2: DS1.13 U3.C16 | length 2679.7
  Top Layer w10: U3.C16 4307.36,4349.84 6020.6,4349.84 6220,4150.44 DS1.13
GND: C1.1 C2.2 C3.1 C4.2 DS2.2 J1.2 JTAG1.4 JTAG1.6 JTAG1.8 LED1.2 LED2.2 LED3.2 LED4.2 LED5.2 SW1.1 SW1.2 SW1.3 SW1.4 SW2.1 SW2.2 SW2.3 SW2.4 SW3.3 SW5.4 U1.1 U2.2 U2.4 U3.A1 U3.A16 U3.F6 U3.F11 U3.G7 U3.G8 U3.G9 U3.G10 U3.H4 U3.H7 U3.H8 U3.H9 U3.H10 U3.J7 U3.J8 U3.J9 U3.J10 U3.K7 | length 12476.8
  Top Layer w10: SW2.4 1820,2340.9 1457.57,1978.46 1429.28,1978.46 1390.91,1940.09 1390.91,1722.56 SW5.4 1678.46,1435 1964.87,1435 2125.47,1274.39 ; SW2.1 1845,3175 SW1.4 ; SW1.1 1845,4270.55 1673.94,4441.61 2746.61,4441.61 2807.44,4502.44 2812.05,4502.44 2832.56,4522.94 2832.56,4527.56 DS2.2 2964.88,4470.12 ; SW3.3 2135.85,1380.85 2135.85,1327.75 2171.56,1292.05 2216.37,1292.05 2234.53,1273.89 2234.53,1202.41 2225.74,1193.62 2154.26,1193.62 2145.47,1202.41 2145.47,1254.39 2125.47,1274.39 ; LED5.2 2989.21,1545 3066.77,1467.44 3227.44,1467.44 ; U1.1 3055.51,4665.16 3049.65,4659.3 3049.65,4567.53 3084.33,4532.85 3090.36,4532.85 3125.05,4498.17 3125.05,4471.52 3106.2,4452.67 2982.33,4452.67 2964.88,4470.12 ; U3.A1 3300.24,4095.39 3300.24,4304.84 3259.65,4345.43 3158.2,4345.43 3115.71,4302.95 3115.71,4273.35 3106.92,4264.57 3043.31,4264.57 3024.39,4283.49 3024.39,4296.08 3005.47,4315 C1.1 2964.88,4470.12 ; U3.F6 U3.G7 U3.G8 U3.G9 U3.G10 U3.H10 U3.J10 U3.J9 U3.J8 U3.J7 ; U3.K7 U3.J7 ; U2.2 U2.4 4134.76,4525 4129.17,4519.41 4129.17,4353.9 4015.12,4239.84 C4.2 4015.12,4220.16 3932.48,4137.52 U3.A16 ; U3.H9 U3.H8 U3.H7 U3.J7 ; JTAG1.4 5234.76,2400.24 5234.76,2364.6 5270.51,2328.85 5270.51,2250.51 4477.44,1457.44 4157.56,1457.44 LED2.2 4017.44,1512.44 3874.27,1512.44 3841.71,1545 LED3.2 3667.44,1502.44 3277.56,1502.44 LED4.2 3227.44,1467.44 ; 2125.47,1274.39 2125.47,1194.12 2145.97,1173.62 2933.63,1173.62 3227.44,1467.44
NetC5_2: C5.2 JTAG1.10 Y1.2 | length 619.4
  Top Layer w10: 5479.49,2410.73 5479.49,2391.15 5511.46,2359.17 5696.9,2359.17 5707.13,2369.4 5707.13,2373.43 5717.35,2383.65 5719.06,2383.65 5719.06,2359.17 5835.16,2243.07 5926.38,2243.07 5952.08,2268.77 Y1.2@5952.08,2287
NetDS1_1: DS1.1 DS1.5 R20.1 | length 1134.2
  Top Layer w10: DS1.1 5766.79,3176.79 5874.14,3176.79 5892.86,3195.51 5947.14,3195.51 5967.14,3175.51 6074.49,3175.51 DS1.5 6120,2815.06 6140.83,2794.23 6140.83,2493.1 6124.85,2477.13 6119.84,2477.13 R20.1
NetDS1_2: DS1.2 DS1.6 R19.2 | length 1661.7
  Top Layer w10: DS1.2 5774.49,3084.49 5683.27,3084.49 5674.49,3093.28 5674.49,3166.72 5723.27,3215.51 5756.3,3215.51 5770,3229.22 5970,3229.22 5983.7,3215.51 6134.49,3215.51 DS1.6 6220,2406.73 6279.02,2347.72 R19.2
NetDS1_3: DS1.3 DS1.8 R18.1 | length 1739.6
  Top Layer w10: R18.1 5895.98,2695 5906.57,2705.59 5910.6,2705.59 5920.83,2715.82 5920.83,3129.17 5911.89,3120.24 5874.6,3120.24 5818.85,3064.49 5674.99,3064.49 5654.49,3084.99 5654.49,3175.01 5728.69,3249.22 6165.15,3249.22 6265.51,3148.85 6265.51,3120.12 6301.15,3084.49 6374.49,3084.49 DS1.8
NetDS1_7: DS1.7 DS1.17 R22.1 | length 2295.8
  Top Layer w10: DS1.17 5820,3630 DS1.7 6365.51,3175.51 6438.85,3175.51 6465.51,3148.85 6465.51,2560.69 6475.83,2550.38 6475.83,2140.39 6459.85,2124.41 6454.84,2124.41 R22.1
NetDS1_10: DS1.10 DS1.15 R17.1 | length 777.2
  Top Layer w10: R17.1 5970,4046.14 DS1.15 6029.76,3986.38 6065.4,3986.38 6101.15,3950.63 6138.85,3950.63 6158.85,3970.63 6181.15,3970.63 6201.15,3950.63 6238.85,3950.63 6270,3981.78 6270,4010.51 6301.15,4041.65 6372.86,4041.65 6392.86,4061.65 6454.49,4061.65 DS1.10
NetDS1_11: DS1.11 DS1.16 R16.1 | length 721.3
  Top Layer w10: R16.1 5840,4076.14 DS1.16 5933.34,3996.14 5958.85,3970.63 5981.15,3970.63 6021.15,3930.63 6354.49,3930.63 DS1.11
NetDS1_12: DS1.12 DS1.18 R21.2 | length 1723.9
  Top Layer w10: R21.2 5556.57,3832.72 DS1.18 5729.76,4005.9 5765.4,4005.9 5801.15,4041.65 5838.85,4041.65 5870,4010.51 5870,3981.78 5901.15,3950.63 5972.86,3950.63 6012.86,3910.63 6398.85,3910.63 6465.51,3977.29 6465.51,4014.99 6438.85,4041.65 6401.15,4041.65 6365.4,4005.9 6329.76,4005.9 DS1.12
NetDS2_1: DS2.1 R11.2 | length 264.6
  Top Layer w10: R11.2 2662.28,4672.72 DS2.1
NetJ1_1: J1.1 SW4.2 | length 855.3
  Top Layer w10: J1.1 1532.2,4612.9 1556.68,4588.43 SW4.2
NetLED1_1: LED1.1 R5.1 | length 348
  Top Layer w10: LED1.1 4427.28,1507.28 R5.1
NetLED2_1: LED2.1 R6.1 | length 345.1
  Top Layer w10: LED2.1 3972.28,1567.28 R6.1
NetLED3_1: LED3.1 R7.1 | length 343.2
  Top Layer w10: R7.1 3602.28,1552.72 LED3.1
NetLED4_1: LED4.1 R8.1 | length 295.8
  Top Layer w10: LED4.1 3170,1716.73 3232.28,1779.02 R8.1
NetLED5_1: LED5.1 R9.1 | length 369.9
  Top Layer w10: LED5.1 2740,1679.6 2812.28,1751.88 R9.1
NetU3_F7: U3.F7 U3.F8 U3.F9 U3.F10 U3.G6 U3.G11 U3.H6 U3.H11 U3.J6 U3.J11 U3.K6 U3.K11 U3.L7 U3.L8 U3.L9 U3.L10 | length 465.7
  Top Layer w10: U3.L7 U3.L8 U3.L9 U3.L10 U3.K11 U3.J11 U3.H11 U3.G11 U3.F10 U3.F9 U3.F8 U3.F7
RESET_N: R10.1 SW5.3 U3.T2 | length 2656.3
  Top Layer w10: SW5.3 1522.09,1847.28 R10.1 1820.98,1847.28 1831.57,1857.87 1835.6,1857.87 2607.9,2630.17 2607.9,2689.75 U3.T2
RESULT0: R5.2 U3.T11 | length 1919.3
  Top Layer w10: U3.T11 4462.72,2736.06 R5.2
RESULT1: R6.2 U3.T8 | length 1729.8
  Top Layer w10: U3.T8 4007.72,3072.95 R6.2
RESULT2: R7.2 U3.T6 | length 1619.1
  Top Layer w10: U3.T6 3637.72,3364.21 R7.2
RESULT3: R8.2 U3.T5 | length 1779.1
  Top Layer w10: R8.2 3267.72,3231.46 U3.T5
SEG_A: R16.2 U3.F16 | length 2035.3
  Top Layer w10: U3.F16 4732.23,3856.85 5040.82,4165.43 R16.2
SEG_B: R17.2 U3.E16 | length 2170.7
  Top Layer w10: U3.E16 4743.32,3896.22 5037.38,4190.28 5941.46,4190.28 5969.02,4162.72 R17.2
SEG_C: R18.2 U3.J16 | length 2380.2
  Top Layer w10: U3.J16 4885.71,3738.74 5894.02,2730.43 R18.2
SEG_D: R19.1 U3.L16 | length 2905.8
  Top Layer w10: U3.L16 4770.05,3660 6117.77,2312.28 R19.1
SEG_E: R20.2 U3.K16 | length 2690.7
  Top Layer w10: U3.K16 4850.19,3699.37 5879.4,2670.16 5977.4,2670.16 6115,2532.56 R20.2
SEG_F: R21.1 U3.G16 | length 1215.9
  Top Layer w10: U3.G16 4526.43,3817.48 4546.62,3797.28 R21.1
SEG_G: R22.2 U3.M16 | length 3124.6
  Top Layer w10: U3.M16 4781.13,3620.63 6246.76,2155 R22.2
TCK: JTAG1.1 U3.P13 | length 1747
  Top Layer w10: 3834.06,3411.12 4935.17,2310 JTAG1.1
TDI: JTAG1.3 U3.R14
TDO: JTAG1.5 U3.R16 | length 1924.2
  Top Layer w10: U3.R16 4196.84,3502.52 5270.51,2428.85 5270.51,2364.49 JTAG1.5
TMS: JTAG1.7 U3.T15 | length 1847.2
  Top Layer w10: U3.T15 4410.81,2945.45 4653.91,2945.45 5170.51,2428.85 5170.51,2364.49 5225,2310
TRST: JTAG1.9 U3.P15 | length 2182.2
  Bottom Layer w10: 3890,3540 3895,3540 5125,2310 5170.51,2355.51 5443.85,2355.51 5479.6,2319.76 5515.24,2319.76 JTAG1.9
VCC: C5.1 JTAG1.2 Y1.1 Y1.4 | length 471.3
  Top Layer w10: 5525,2410 5538.81,2410 5563.81,2385 C5.1 5682.28,2385.98 5692.87,2396.57 5692.87,2400.6 5703.1,2410.83 5822.48,2410.83 5863.03,2370.28 Y1.4 Y1.1
pads on no net: DS1.4 DS1.9 J1.3 SW4.3 SW5.1 SW5.2 U3.A2 U3.A3 U3.A4 U3.A5 U3.A6 U3.A7 U3.A8 U3.A9 U3.A10 U3.A11 U3.A12 U3.A13 U3.A14 U3.A15 U3.B2 U3.B3 U3.B4 U3.B5 U3.B6 U3.B7 U3.B8 U3.B9 U3.B10 U3.B11 U3.B12 U3.B13 U3.B14 U3.B15 U3.B16 U3.C2 U3.C4 U3.C5 U3.C6 U3.C7 U3.C8 U3.C9 U3.C10 U3.C11 U3.C12 U3.C13 U3.C15 U3.D2 U3.D3 U3.D4 U3.D5 U3.D6 U3.D7 U3.D8 U3.D9 U3.D10 U3.D11 U3.D12 U3.D13 U3.D14 U3.D15 U3.E2 U3.E3 U3.E4 U3.E8 U3.E9 U3.E13 U3.E14 U3.E15 U3.F2 U3.F3 U3.F4 U3.F13 U3.F14 U3.F15 U3.G2 U3.G3 U3.G4 U3.G13 U3.G14 U3.G15 U3.H2 U3.H3 U3.H5 U3.H12 U3.H13 U3.H14 U3.H15 U3.H16 U3.J2 U3.J4 U3.J5 U3.J12 U3.J13 U3.J14 U3.J15 U3.K1 U3.K2 U3.K3 U3.K4 U3.K8 U3.K9 U3.K10 U3.K13 U3.K14 U3.K15 U3.L1 U3.L2 U3.L3 U3.L4 U3.L6 U3.L11 U3.L13 U3.L14 U3.L15 U3.M1 U3.M2 U3.M3 U3.M4 U3.M8 U3.M9 U3.M13 U3.M14 U3.M15 U3.N1 U3.N2 U3.N3 U3.N4 U3.N5 U3.N6 U3.N7 U3.N8 U3.N9 U3.N10 U3.N11 U3.N12 U3.N13 U3.N15 U3.P1 U3.P2 U3.P4 U3.P5 U3.P6 U3.P7 U3.P8 U3.P9 U3.P10 U3.P11 U3.P16 U3.R1 U3.R2 U3.R3 U3.R4 U3.R5 U3.R6 U3.R7 U3.R8 U3.R9 U3.R10 U3.R11 U3.R12 U3.R13 U3.R15 U3.T1 U3.T7 U3.T9 U3.T10 U3.T12 U3.T13 U3.T14 U3.T16